# Altium PCB Fast_Servo.PCBDOC (part 5 of 11)
Units mm, origin at the board's own origin, x right, y up, seen from the top; angles counter-clockwise.
Board outline 162.48 x 100 mm, 6 copper layers (Top, GP1(GND), L3, L4, P3V3, Bot), stack 1.716 mm thick; 668 components, 491 nets, 2308 pads, 1133 vias.
Unrouted connection lines stored in the file: 2.
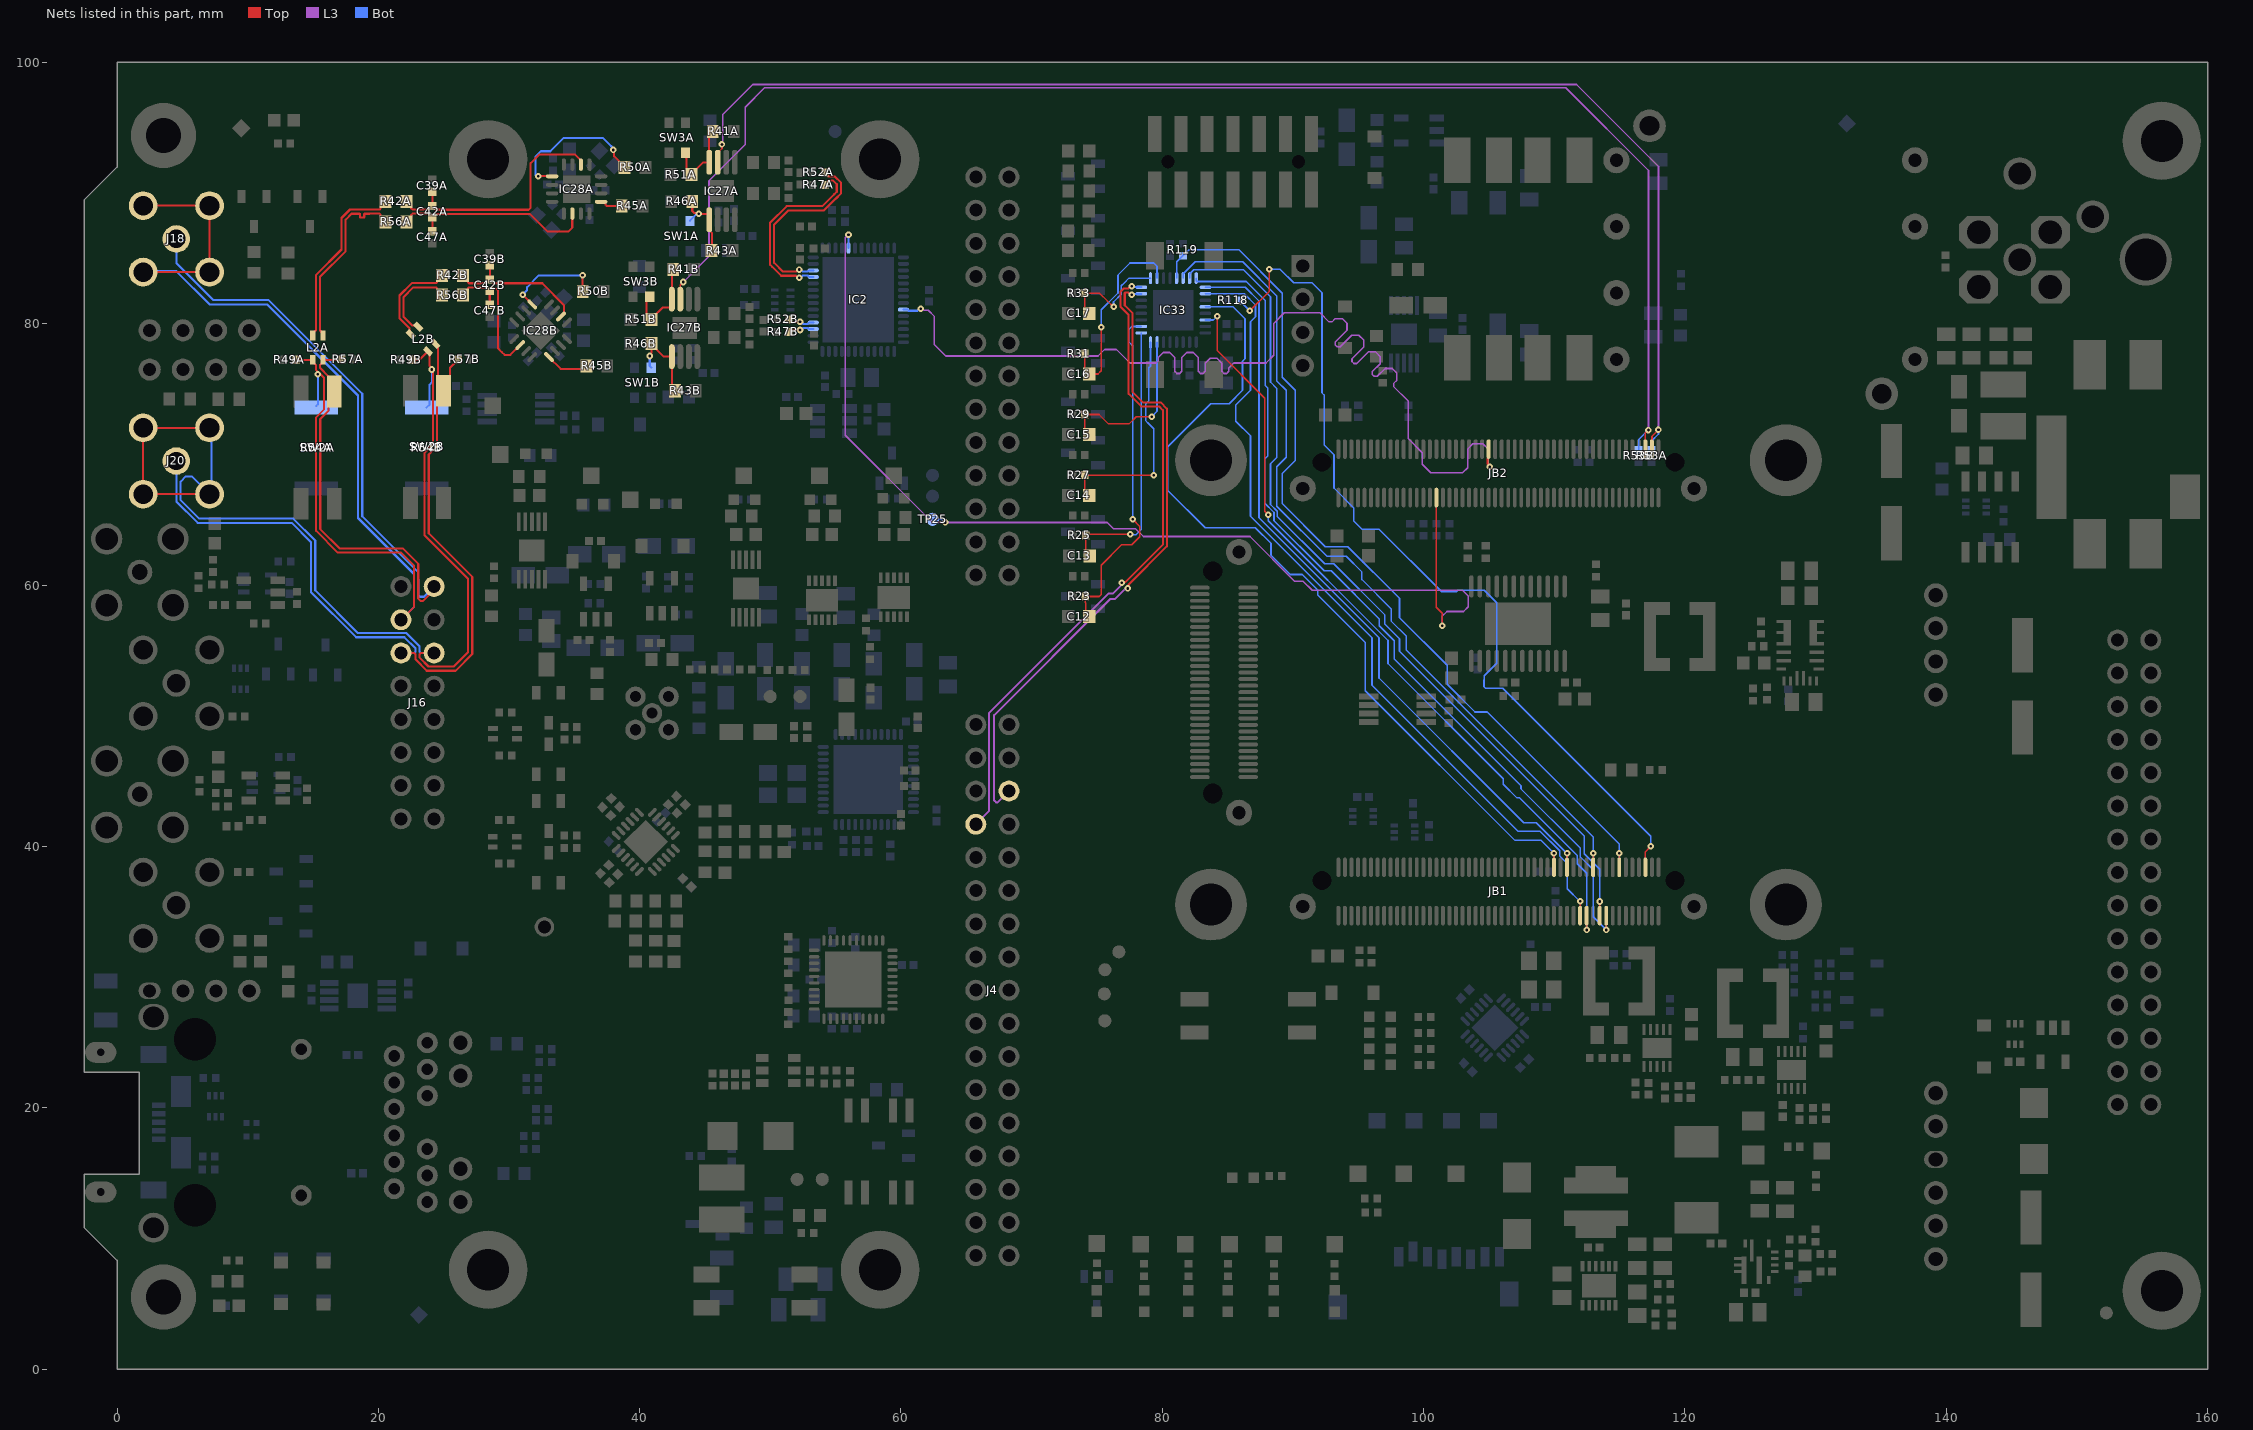
[diagram p7: the nets of this part, all layers, seen from the top]

## Via types
v1: diameter 0.5, hole 0.2, Top to Bot, tented both sides, 1045 vias
v2: diameter 0.8, hole 0.4, Top to Bot, tented both sides, 40 vias
v3: diameter 0.6, hole 0.3, Top to Bot, tented both sides, 27 vias
v4: diameter 1.27, hole 0.711, Top to Bot, tented both sides, 11 vias
v5: diameter 0.7, hole 0.5, Top to Bot, tented both sides, 10 vias

## Nets (pads, with @x,y where several pads share a name; then routed paths per layer and width w, separated by ;. In a path a pad name is that pad's centre, name@x,y a point inside that pad or via, vN(x,y) a via of type N, cw(c..) or ccw(c..) an arc to the next point about the centre after c; other vN are vias at no path point) (continued)
ADC_AUX_A2: (continued)
  Bot w0.125: IC33.23@82.096,83.498 82.096,83.823 82.409,84.136 86.211,84.136 88.282,82.064 88.282,75.54 88.768,75.054 88.768,69.77 88.282,69.284 88.282,66.176 88.799,65.659 88.799,65.251 92.425,61.625 93.119,61.625 97.037,57.707 97.037,57.012 98.15,55.9 98.15,54.942 112.287,40.804 112.287,39.438 113.475,38.25 v1(113.475,35.786)
ADC_AUX_CH1_N: C13.2 IC33.9 R25.1 | length 21.3
  Top w0.125: C13.2@74.459,62.234 74.129,62.564 R25.1@74.129,63.809 74.208,63.888 v1(77.55,63.888) v1@77.471,63.809
  Bot w0.125: v1(77.55,63.888) 77.572,63.866 77.983,63.866 78.378,64.26 78.378,77.309 78.396,77.328 IC33.9@78.396,79.298
ADC_AUX_CH1_P: C12.2 IC33.10 R23.1 | length 26.3
  Top w0.125: C12.2@74.402,57.584 74.134,57.852 74.134,58.636 74.104,58.666 R23.1@74.104,59.134 75.175,59.134 75.325,59.284 75.325,61.53 76.875,63.08 77.672,63.08 78.284,63.692 78.284,64.489 v1(77.733,65.04)
  Bot w0.125: v1(77.733,65.04) 77.733,78.318 77.446,78.604 77.446,79.589 77.656,79.798 IC33.10@78.396,79.798
ADC_AUX_CH2_N: C17.2 IC33.17 R33.1 | length 8.6
  Top w0.125: C17.2@74.402,80.8 74.072,81.13 R33.1@74.072,82.348 75.201,82.348 75.811,81.739 76.241,81.309 v1(76.27,81.309)
  Bot w0.125: v1(76.27,81.309) 76.27,81.665 76.86,82.254 76.86,82.911 77.1,83.152 77.446,83.498 IC33.17@79.096,83.498
ADC_AUX_CH2_P: C16.2 IC33.18 R31.1 | length 14.9
  Top w0.125: R31.1@74.072,77.705 74.072,76.487 C16.2@74.402,76.157 75.075,76.157 75.325,76.407 v1(75.325,79.739)
  Bot w0.125: v1(75.325,79.739) 75.325,81.073 76.61,82.358 76.61,83.729 77.53,84.65 79.341,84.65 79.596,84.394 IC33.18@79.596,83.498
ADC_AUX_CH3_N: C15.2 IC33.7 R29.1 | length 13.2
  Top w0.125: C15.2@74.402,71.514 74.072,71.844 R29.1@74.072,73.062 75.159,73.062 75.882,72.338 77.451,72.338 78.008,72.894 v1(79.185,72.894)
  Bot w0.125: v1(79.185,72.894) 79.596,73.306 IC33.7@79.596,78.598
ADC_AUX_CH3_P: C14.2 IC33.8 R27.1 | length 17.6
  Top w0.125: C14.2@74.402,66.871 74.072,67.201 R27.1@74.072,68.418 74.086,68.404 v1(79.341,68.404)
  Bot w0.125: IC33.8@79.096,78.598 79.096,76.761 78.971,76.636 78.971,74.098 78.721,73.848 78.721,72.593 78.971,72.343 79.341,71.974 v1(79.341,68.404)
ADC_AUX_DOUTA: IC33.30 JB1.78 | length 60.9
  Top w0.125: v1(84.198,80.578) 84.198,77.952 87.84,74.31 87.84,65.646 v1(88.111,65.374) ; v1(112.475,33.609) JB1.78@112.475,34.704
  Bot w0.125: IC33.30@83.296,80.293 83.913,80.293 v1(84.198,80.578) ; v1(88.111,65.374) 88.111,64.923 97.275,55.759 97.275,54.004 106.102,45.177 106.102,44.76 107.149,43.714 107.348,43.714 111.75,39.311 111.75,38.674 112.475,37.949 v1(112.475,33.609)
ADC_AUX_DOUTB: IC33.28 JB1.67 | length 64.9
  Top w0.125: JB1.67@109.975,38.404 v1(109.975,39.479)
  Bot w0.125: IC33.28@83.299,81.296 85.414,81.296 86.326,80.385 86.326,77.315 86.138,77.128 86.138,74.907 85.124,73.892 83.719,73.892 80.422,70.595 80.422,67.25 83.277,64.395 87.124,64.395 88.316,63.202 88.316,62.282 89.783,60.816 90.702,60.816 91.895,59.623 91.895,59.242 95.535,55.603 95.535,51.916 106.989,40.462 108.992,40.462 v1(109.975,39.479)
ADC_AUX_N: IC33.15 J4.29 | length 49.7
  Top w0.16: v1(77.345,59.744) 77.412,59.811 77.412,60.025 80.351,62.965 80.351,73.513 79.876,73.988 78.512,73.988 77.733,74.767 77.733,80.803 77.125,81.411 77.125,82.339 77.178,82.392 77.405,82.392 77.562,82.235 v1(77.656,82.235)
  L3 w0.152: J4.29@68.27,44.24 67.405,43.375 67.275,43.375 67.135,43.515 67.135,50.042 76.034,58.941 76.383,58.941 76.81,59.368 77.119,59.678 77.278,59.678 v1(77.345,59.744)
  Bot w0.152: v1(77.656,82.235) 77.72,82.298 IC33.15@78.396,82.298
ADC_AUX_nCS: IC33.26 JB1.76 | length 63.5
  Top w0.125: JB1.76@111.975,34.704 v1(111.975,35.793)
  Bot w0.125: IC33.26@83.296,82.298 86.279,82.298 87.138,81.44 87.138,80.537 86.751,80.151 86.751,74.906 85.628,73.784 85.628,72.546 86.751,71.423 86.751,65.273 96.048,55.975 96.048,52.343 107.215,41.176 108.897,41.176 110.412,39.66 110.412,39.276 111,38.688 111,36.768 v1(111.975,35.793)
ADC_AUX_P: IC33.16 J4.28 | length 50.9
  Top w0.16: v1(76.902,60.187) 76.968,60.254 77.199,60.254 80.039,63.094 80.039,73.384 79.746,73.676 78.382,73.676 77.421,74.638 77.421,80.674 76.813,81.281 76.813,82.468 77.049,82.704 77.405,82.704 77.562,82.862 v1(77.656,82.862)
  L3 w0.152: J4.28@65.73,41.7 66.733,42.703 66.733,50.209 75.867,59.343 76.216,59.343 76.643,59.77 76.835,59.962 76.835,60.121 v1(76.902,60.187)
  Bot w0.152: v1(77.656,82.862) 77.72,82.798 IC33.16@78.396,82.798
ADC_AUX_RANGE: IC33.21 JB1.87 R119.2 | length 68.1
  Top w0.125: JB1.87@114.975,38.404 v1(114.975,39.479)
  Bot w0.125: IC33.21@81.096,83.498 81.096,84.742 81.326,84.972 81.346,84.972 R119.2@81.573,85.199 81.801,85.427 81.821,85.427 82.052,85.658 85.869,85.658 89.185,82.343 89.185,75.909 90.172,74.922 90.172,69.544 89.171,68.543 89.171,66.24 92.462,62.948 94.194,62.948 98.15,58.992 98.15,57.508 101.8,53.858 101.8,52.418 103.928,50.29 104.874,50.29 114.975,40.189 v1(114.975,39.479)
ADC_AUX_SCLK: JB1.95 R118.1 | length 68.7
  Top w0.125: v1(86.7,81) 88.178,82.478 v1(88.178,84.163) ; JB1.95@116.975,38.404 116.975,39.602 v1(117.391,40.019)
  Bot w0.125: R118.1@85.918,81.794 85.918,81.774 86.692,81 v1(86.7,81) ; v1(88.178,84.163) 89.039,84.163 90.05,83.152 91.457,83.152 92.225,82.384 92.225,74.71 92.408,74.527 92.408,70.711 93.137,69.983 93.137,67.427 94.662,65.903 94.662,64.903 95.278,64.287 96.588,64.287 101.386,59.489 102.51,59.489 102.618,59.597 104.649,59.597 105.604,58.642 105.604,54.027 104.637,53.061 104.637,52.753 104.625,52.741 104.625,52.22 104.743,52.102 106.059,52.102 117.391,40.77 v1(117.391,40.019)
ADC_AUX_SGL: IC33.22 JB1.79 | length 64.2
  Top w0.125: JB1.79@112.975,38.404 v1(112.975,39.479)
  Bot w0.125: IC33.22@81.596,83.498 81.596,83.823 82.512,84.739 86.152,84.739 88.768,82.122 88.768,75.624 89.486,74.907 89.486,69.781 88.768,69.064 88.768,66.043 92.611,62.201 94.085,62.201 95.278,61.007 95.278,60.426 97.51,58.194 97.51,57.256 98.661,56.105 98.661,55.03 112.975,40.716 v1(112.975,39.479)
ADC_CH1.SIG_N: IC2.12 R52A.2 | length 14.9
  Top w0.16: v1(52.224,84.152) 52.13,84.152 51.972,83.994 50.972,83.994 50.294,84.672 50.283,84.672 50.283,87.581 51.388,88.686 54.111,88.686 55.019,89.594 ; R52A.2@54.155,91.595 54.155,91.575 54.454,91.276 54.946,91.276 55.402,90.82 55.402,89.965 55.025,89.588
  Bot w0.16: v1(52.224,84.152) 52.318,84.152 52.479,83.991 52.871,83.991 52.969,84.089 IC2.12@53.284,84.089
ADC_CH1.SIG_P: IC2.11 R47A.2 | length 14.9
  Top w0.16: v1(52.224,83.525) 52.13,83.525 51.98,83.674 50.839,83.674 50.161,84.352 50.15,84.352 49.963,84.54 49.963,87.713 51.255,89.006 53.979,89.006 54.886,89.914 54.898,89.914 55.082,90.098 55.082,90.687 54.813,90.956 54.454,90.956 54.155,90.657 R47A.2@54.155,90.637
  Bot w0.16: v1(52.224,83.525) 52.318,83.525 52.479,83.686 52.871,83.686 52.969,83.589 IC2.11@53.284,83.589
ADC_CH2.SIG_N: IC2.4 R52B.2 | length 2
  Top w0.16: R52B.2@51.435,80.334 51.617,80.152 v1(52.272,80.152)
  Bot w0.16: v1(52.272,80.152) 52.366,80.152 52.523,79.995 52.875,79.995 52.969,80.088 IC2.4@53.284,80.088
ADC_CH2.SIG_P: IC2.3 R47B.2 | length 2
  Top w0.16: R47B.2@51.435,79.377 51.583,79.525 v1(52.272,79.525)
  Bot w0.16: v1(52.272,79.525) 52.366,79.525 52.523,79.682 52.875,79.682 52.969,79.589 IC2.3@53.284,79.589
ADC_CS: IC2.19 JB2.32 TP25.1 | length 84.2
  Top w0.125: JB2.32@100.975,66.704 100.975,58.305 101.431,57.848 v1(101.431,56.9)
  L3 w0.125: v1(55.984,86.824) 55.744,86.584 55.744,71.468 62.417,64.795 v1(63.4,64.795) 75.797,64.795 76.267,64.326 77.954,64.326 78.562,63.717 86.714,63.717 90.148,60.283 90.793,60.283 91.479,59.597 102.982,59.597 103.414,59.164 103.414,58.348 103.05,57.984 101.784,57.984 101.431,57.631 v1(101.431,56.9)
  Bot w0.125: IC2.19@55.984,85.788 v1(55.984,86.824) ; TP25.1@62.415,65.04 63.102,65.04 63.347,64.795 v1(63.4,64.795)
ADC_CTRL.DCO_N: IC2.35 JB2.47 | length 79.1
  Top w0.16: JB2.47@104.975,70.404 104.975,69.764 104.889,69.678 104.889,69.311 105.05,69.149 v1(105.05,69.055)
  L3 w0.125: v1(61.504,81.152) 61.605,81.152 61.731,81.026 62.096,81.026 62.559,80.563 62.559,78.402 63.427,77.535 75.084,77.535 75.582,78.032 76.488,78.032 77.521,76.999 79.524,76.999 79.684,77.159 79.684,77.419 80.064,77.799 80.58,77.799 80.959,77.419 80.959,76.359 81.12,76.199 81.324,76.199 81.484,76.359 81.484,77.419 81.864,77.799 82.38,77.799 82.76,77.419 82.76,76.359 82.92,76.199 83.124,76.199 83.285,76.359 83.285,76.984 83.664,77.364 84.18,77.364 84.56,76.984 84.56,76.359 84.72,76.199 84.924,76.199 85.085,76.359 85.085,76.619 85.464,76.999 86.11,76.999 87.941,76.999 88.529,77.587 88.529,80.025 89.339,80.835 92.065,80.835 92.755,80.145 92.982,80.145 93.236,80.399 93.773,80.399 94.138,80.035 94.138,79.498 93.247,78.607 93.247,78.38 93.392,78.236 93.618,78.236 94.509,79.127 95.046,79.127 95.411,78.762 95.411,78.225 94.52,77.334 94.52,77.108 94.664,76.963 94.891,76.963 95.782,77.854 96.319,77.854 96.683,77.489 96.683,76.952 96.08,76.349 96.08,76.122 96.225,75.977 96.451,75.977 97.055,76.581 97.592,76.581 97.956,76.217 97.956,75.679 97.702,75.425 97.702,75.198 98.812,74.088 98.812,71.222 99.895,70.139 99.895,69.241 100.543,68.593 102.982,68.593 103.38,68.991 103.38,70.424 103.77,70.814 104.535,70.814 104.924,70.425 104.924,69.283 105.05,69.157 v1(105.05,69.055)
  Bot w0.16: IC2.35@60.184,81.088 60.497,81.088 60.587,80.998 61.258,80.998 61.412,81.152 v1(61.504,81.152)